# Altium PCB PCI Express Mini L1_V2.PCBDOC (part 7 of 9)
Units mm, origin at the board's own origin, x right, y up, seen from the top; angles counter-clockwise.
Board outline 70 x 83.2 mm, 6 copper layers (TopLayer, Layer 1, Layer 2, Layer 3, Layer 4, Bottom Layer), stack 0.893 mm thick; 442 components, 259 nets, 1412 pads, 870 vias.
Unrouted connection lines stored in the file: 2.
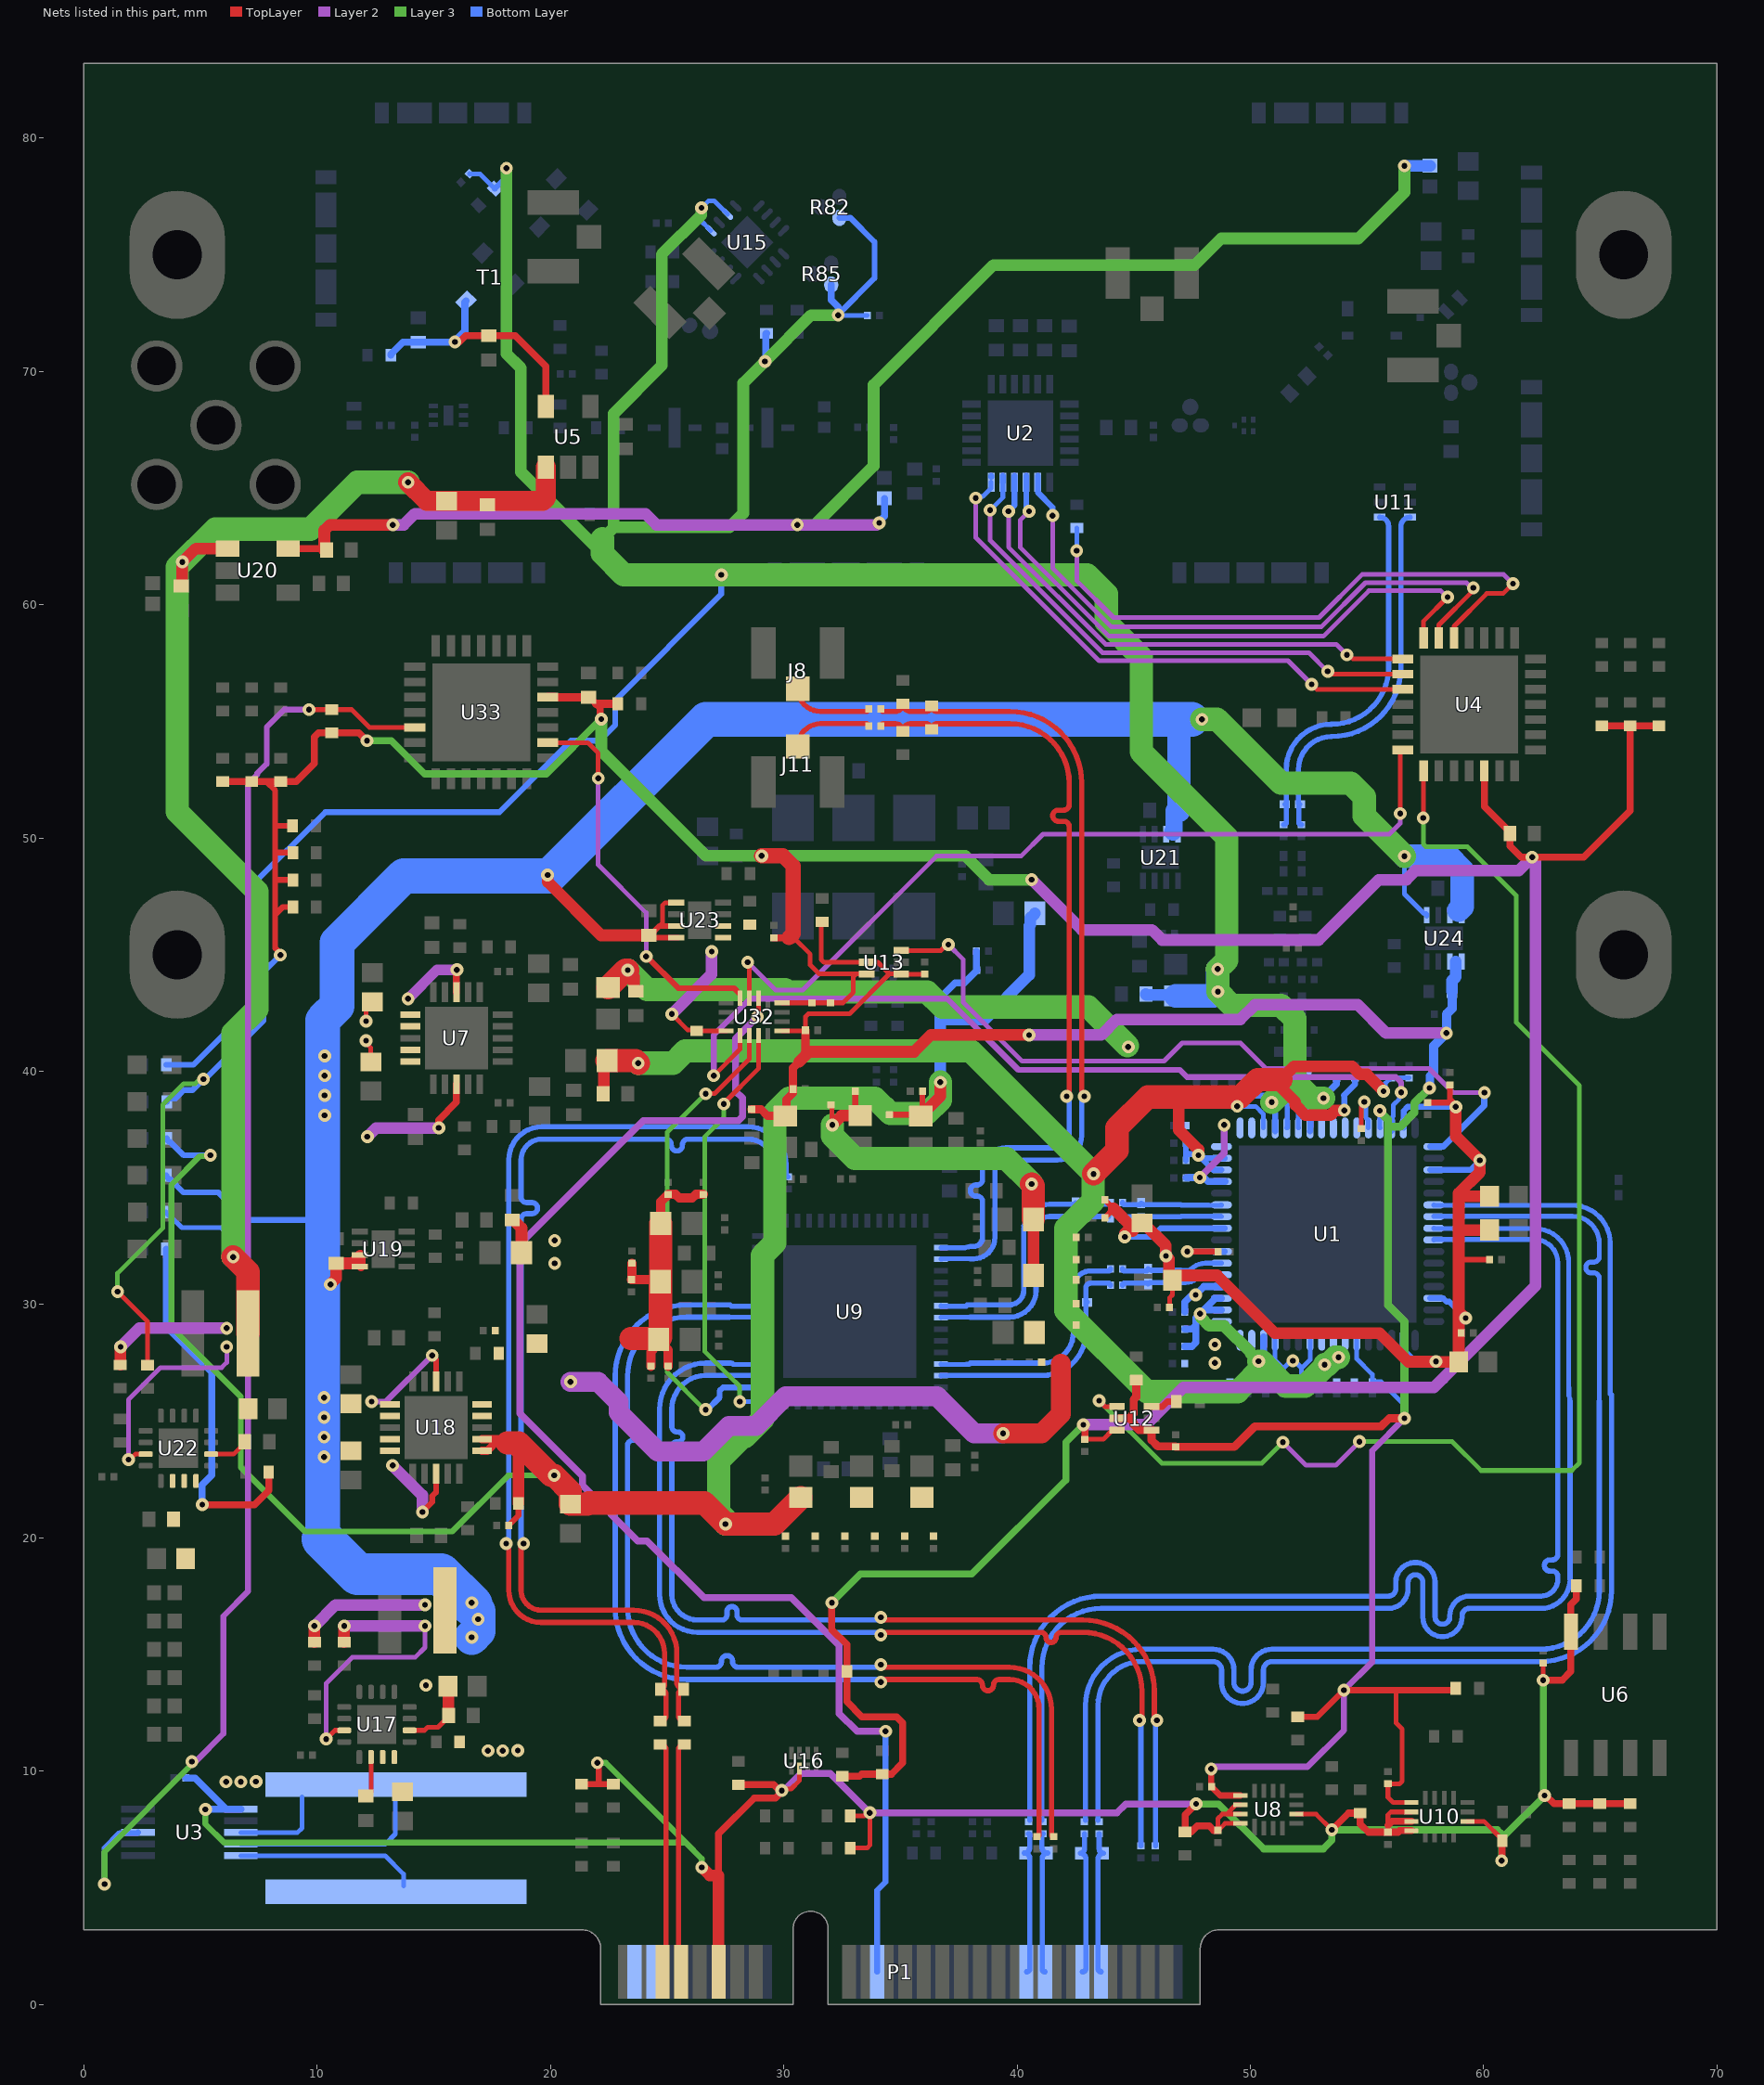
[diagram p7: the nets of this part, all layers, seen from the top]

## Via types
v1: diameter 0.55, hole 0.25, TopLayer to Bottom Layer, tented both sides, 777 vias
v2: diameter 0.5, hole 0.2, TopLayer to Bottom Layer, 43 vias
v3: diameter 0.55, hole 0.25, TopLayer to Bottom Layer, 40 vias
v4: diameter 0.35, hole 0.2, TopLayer to Bottom Layer, 10 vias

## Nets (pads, with @x,y where several pads share a name; then routed paths per layer and width w, separated by ;. In a path a pad name is that pad's centre, name@x,y a point inside that pad or via, vN(x,y) a via of type N, cw(c..) or ccw(c..) an arc to the next point about the centre after c; other vN are vias at no path point) (continued)
CLKout1_N: (continued)
  Bottom Layer w0.21: 27.839,27.441 27.845,27.435 28.931,27.435 U9.17@28.931,27.45
  Bottom Layer w0.223: 27.839,27.441 ccw(c27.715,27.318) 27.715,27.492 26.649,27.492 ccw(c26.649,25.516) 24.672,25.516 24.672,17.586 ccw(c26.303,17.586) 26.303,15.954 34.046,15.954 cw(c34.046,15.843) v1(34.157,15.843) ; v1(45.243,12.182) cw(c45.243,12.119) 45.306,12.119 C189.1@45.306,6.803
CLKout1_P: C188.1 U9.16 | length 43.7
  TopLayer w0.223: v1(34.157,16.593) ccw(c34.268,16.593) 34.268,16.482 42.814,16.482 cw(c42.814,13.414) 45.882,13.414 45.882,12.293 ccw(c45.993,12.293) v1(45.993,12.182)
  Bottom Layer w0.21: 27.659,26.965 28.931,26.965 U9.16@28.931,26.95
  Bottom Layer w0.223: 27.659,26.965 26.649,26.965 ccw(c26.649,25.516) 25.2,25.516 25.2,25.119 25.2,24.766 ccw(c25.423,24.766) 25.423,24.542 25.456,24.542 cw(c25.456,24.329) 25.67,24.329 cw(c25.456,24.329) 25.456,24.116 25.423,24.116 ccw(c25.423,23.893) 25.2,23.893 25.2,23.354 25.2,17.586 ccw(c26.303,17.586) 26.303,16.482 26.8,16.482 27.34,16.482 ccw(c27.34,16.706) 27.564,16.706 27.564,16.844 cw(c27.777,16.844) 27.777,17.057 cw(c27.777,16.844) 27.99,16.844 27.99,16.706 ccw(c28.213,16.706) 28.213,16.482 28.752,16.482 34.046,16.482 ccw(c34.046,16.593) v1(34.157,16.593) ; C188.1@45.93,6.803 45.93,12.119 cw(c45.993,12.119) v1(45.993,12.182)
CLKout3_N: C228.1 U9.22 | length 44.7
  TopLayer w0.223: v1(34.157,13.819) cw(c34.268,13.819) 34.268,13.93 37.683,13.93 38.272,13.93 cw(c38.272,13.691) 38.511,13.691 ccw(c38.75,13.691) 38.75,13.453 ccw(c38.75,13.691) 38.988,13.691 cw(c39.227,13.691) 39.227,13.93 39.663,13.93 39.676,13.93 cw(c39.676,12.663) 40.943,12.663 40.943,7.285 cw(c40.85,7.285) C228.1@40.85,7.193
  Bottom Layer w0.21: 27.696,29.991 27.752,29.935 28.706,29.935 28.916,29.935 U9.22@28.931,29.95
  Bottom Layer w0.223: 22.772,26.528 22.772,16.998 ccw(c25.84,16.998) 25.84,13.93 34.046,13.93 cw(c34.046,13.819) v1(34.157,13.819) ; 22.772,26.57 22.772,26.925 cw(c25.84,26.925) 25.84,29.992 27.693,29.992 cw(c27.693,29.988) 27.696,29.991
CLKout3_P: C227.1 U9.21 | length 44.7
  TopLayer w0.223: v1(34.157,14.569) ccw(c34.268,14.569) 34.268,14.458 39.676,14.458 cw(c39.676,12.663) 41.471,12.663 41.471,7.285 ccw(c41.564,7.285) C227.1@41.564,7.193
  Bottom Layer w0.21: 27.659,29.465 28.916,29.465 U9.21@28.931,29.45
  Bottom Layer w0.223: 27.659,29.465 25.84,29.465 ccw(c25.84,26.925) 23.3,26.925 23.3,25.402 23.3,24.906 ccw(c23.539,24.906) 23.539,24.667 23.67,24.667 cw(c23.67,24.429) 23.909,24.429 cw(c23.67,24.429) 23.67,24.19 23.539,24.19 ccw(c23.539,23.951) 23.3,23.951 23.3,23.362 23.3,16.998 ccw(c25.84,16.998) 25.84,14.458 26.649,14.458 27.088,14.458 ccw(c27.088,14.697) 27.326,14.697 27.326,14.719 cw(c27.565,14.719) 27.565,14.958 cw(c27.565,14.719) 27.804,14.719 27.804,14.697 ccw(c28.042,14.697) 28.042,14.458 28.631,14.458 34.046,14.458 ccw(c34.046,14.569) v1(34.157,14.569)
CLKout6_N: C224.1 R92.2 R97.2 U9.44 | length 36.6
  TopLayer w0.223: C224.1@34.156,54.79 cw(c34.266,54.79) 34.266,54.9 34.783,54.9 cw(c34.783,54.575) R97.2@35.108,54.575 cw(c35.433,54.575) 35.433,54.899 36.094,54.899 cw(c36.094,54.663) R92.2@36.33,54.663 cw(c36.566,54.663) 36.566,54.899 39.696,54.899 cw(c39.696,52.359) 42.236,52.359 42.236,52.024 42.236,51.435 cw(c41.997,51.435) 41.997,51.197 41.764,51.197 ccw(c41.764,50.958) 41.526,50.958 ccw(c41.764,50.958) 41.764,50.72 41.997,50.72 cw(c41.997,50.481) 42.236,50.481 42.236,49.875 42.236,39.04 cw(c42.125,39.04) v1(42.125,38.929)
  Bottom Layer w0.21: U9.44@36.731,32.45 ccw(c36.768,32.486) 36.768,32.435 37.771,32.435 cw(c37.996,31.965) 37.99,32.486 37.996,32.492
  Bottom Layer w0.223: 37.996,32.492 38.131,32.492 ccw(c38.131,32.882) 38.521,32.882 38.521,34.301 38.521,34.412 ccw(c38.282,34.412) 38.282,34.651 38.235,34.651 cw(c38.235,34.89) 37.996,34.89 cw(c38.235,34.89) 38.235,35.128 38.282,35.128 ccw(c38.282,35.367) 38.521,35.367 38.521,35.72 cw(c39.523,35.72) 39.523,36.723 41.726,36.723 ccw(c41.726,37.233) 42.236,37.233 42.236,38.818 ccw(c42.125,38.818) v1(42.125,38.929)
CLKout6_P: C223.1 R41.2 R92.1 U9.45 | length 36.6
  TopLayer w0.223: C223.1@34.156,55.54 ccw(c34.269,55.54) 34.269,55.428 34.782,55.428 ccw(c34.782,55.753) R41.2@35.107,55.753 ccw(c35.432,55.753) 35.432,55.427 36.094,55.427 ccw(c36.094,55.663) R92.1@36.33,55.663 ccw(c36.566,55.663) 36.566,55.427 39.696,55.427 cw(c39.696,52.359) 42.764,52.359 42.764,39.04 ccw(c42.875,39.04) v1(42.875,38.929)
  Bottom Layer w0.21: U9.45@36.731,31.95 cw(c36.768,31.913) 36.768,31.965 37.996,31.965
  Bottom Layer w0.223: 37.996,31.965 38.131,31.965 ccw(c38.131,32.882) 39.049,32.882 39.049,35.72 cw(c39.523,35.72) 39.523,36.195 41.726,36.195 ccw(c41.726,37.233) 42.764,37.233 42.764,38.818 cw(c42.875,38.818) v1(42.875,38.929)
CLKout6O_N: C224.2 J11.2 | length 3.7
  TopLayer w0.223: J11.2@30.598,53.923 cw(c31.576,53.923) 31.576,54.901 33.525,54.901 cw(c33.525,54.79) C224.2@33.636,54.79
CLKout6O_P: C223.2 J8.2 | length 3.7
  TopLayer w0.223: J8.2@30.598,56.401 ccw(c31.57,56.401) 31.57,55.429 33.525,55.429 ccw(c33.525,55.54) C223.2@33.636,55.54
CLKout8_N: C183.1 R135.2 U9.50 | length 10.8
  Bottom Layer w0.21: U9.50@36.731,29.45 36.731,29.465 37.996,29.465
  Bottom Layer w0.223: 37.996,29.465 39.663,29.465 ccw(c39.663,30.611) 40.81,30.611 40.81,33.2 cw(c41.387,33.2) 41.387,33.777 42.453,33.777 cw(c42.453,33.717) R135.2@42.512,33.717 cw(c42.572,33.717) 42.572,33.777 C183.1@43.914,33.777
CLKout8_P: C185.1 R135.1 U9.49 | length 10.9
  Bottom Layer w0.21: U9.49@36.731,29.95 36.731,29.935 37.831,29.935 cw(c37.889,29.935) 37.889,29.992 37.996,29.992
  Bottom Layer w0.223: 37.996,29.992 39.663,29.992 ccw(c39.663,30.611) 40.282,30.611 40.282,33.2 cw(c41.387,33.2) 41.387,34.305 42.45,34.305 ccw(c42.45,34.367) R135.1@42.512,34.367 ccw(c42.575,34.367) 42.575,34.305 C185.1@43.914,34.305
CLKout10_N: C187.1 R136.1 U9.54 | length 10.5
  Bottom Layer w0.21: U9.54@36.731,27.45 36.731,27.435 37.824,27.435 37.831,27.441 37.945,27.441 37.996,27.492
  Bottom Layer w0.223: 37.996,27.492 41.087,27.492 ccw(c41.087,28.82) 42.415,28.82 42.415,30.042 ccw(c42.353,30.042) R136.1@42.353,30.104 ccw(c42.353,30.167) 42.417,30.167 42.417,30.712 cw(c43.151,30.712) 43.151,31.446 43.91,31.446 ccw(c43.91,31.534) C187.1@43.998,31.534
CLKout10_P: C186.1 R136.2 U9.55 | length 10.5
  Bottom Layer w0.21: U9.55@36.731,26.95 36.731,26.965 37.996,26.965
  Bottom Layer w0.223: 37.996,26.965 41.087,26.965 ccw(c41.087,28.82) 42.942,28.82 42.942,30.042 cw(c43.003,30.042) R136.2@43.003,30.104 cw(c43.003,30.162) 42.945,30.162 42.945,30.712 cw(c43.151,30.712) 43.151,30.918 43.91,30.918 cw(c43.91,30.83) C186.1@43.998,30.83
CMLout1_ADC_N: C15.1 U1.22 | length 55.7
  Bottom Layer w0.21: U1.22@57.858,34.275 57.858,34.26 63.788,34.26 cw(c63.788,32.625) 65.423,32.625 65.423,26.176 cw(c65.423,26.118) 65.481,26.118 65.481,25.857
  Bottom Layer w0.223: C15.1@43.464,7.893 43.464,12.82 cw(c45.344,12.82) 45.344,14.7 46.766,14.7 48.401,14.7 cw(c48.401,14.334) 48.766,14.334 48.766,13.799 ccw(c49.66,13.799) 50.553,13.799 50.553,14.334 cw(c50.919,14.334) 50.919,14.7 53.927,14.7 62.433,14.7 ccw(c62.433,17.748) 65.481,17.748 65.481,25.857
CMLout1_ADC_P: C16.1 U1.23 | length 55.7
  Bottom Layer w0.21: U1.23@57.858,33.775 57.858,33.79 63.788,33.79 cw(c63.788,32.625) 64.953,32.625 64.953,32.056 cw(c64.721,32.056) 64.721,31.824 64.605,31.824 ccw(c64.605,31.592) 64.373,31.592 ccw(c64.605,31.592) 64.605,31.36 64.721,31.36 cw(c64.721,31.128) 64.953,31.128 64.953,30.712 64.953,25.857
  Bottom Layer w0.223: C16.1@42.936,7.893 42.936,12.82 cw(c45.344,12.82) 45.344,15.228 46.766,15.228 48.401,15.228 cw(c48.401,14.334) 49.294,14.334 49.294,13.799 ccw(c49.66,13.799) 50.025,13.799 50.025,14.334 cw(c50.919,14.334) 50.919,15.228 53.927,15.228 62.433,15.228 ccw(c62.433,17.748) 64.953,17.748 64.953,25.857
CMLout1_N: C15.2 P1.44 R98.2 | length 6.2
  Bottom Layer w0.223: C15.2@43.516,7.321 43.516,6.678 ccw(c43.709,6.678) R98.2@43.709,6.485 ccw(c43.709,6.249) 43.473,6.249 43.473,1.527 ccw(c43.6,1.527) P1.44@43.6,1.4
CMLout1_P: C16.2 P1.42 R98.1 | length 6.2
  Bottom Layer w0.223: P1.42@42.8,1.4 ccw(c42.8,1.545) 42.945,1.545 42.945,6.249 ccw(c42.709,6.249) R98.1@42.709,6.485 ccw(c42.709,6.66) 42.884,6.66 C16.2@42.884,7.321
CMLout2_ADC_N: C17.1 U1.24 | length 55.4
  Bottom Layer w0.21: U1.24@57.858,33.275 57.858,33.26 62.185,33.26 cw(c62.185,31.8) 63.645,31.8 63.645,26.825 63.652,26.145 ccw(c63.875,26.147) 63.656,26.102 63.685,25.964 cw(c63.175,25.857) 63.69,25.938 63.703,25.857
  Bottom Layer w0.223: C17.1@41.064,7.893 41.064,14.438 cw(c43.604,14.438) 43.604,16.978 50.909,16.978 55.915,16.978 ccw(c55.915,17.821) 56.758,17.821 56.758,18.104 cw(c57.073,18.104) 57.387,18.104 57.387,16.615 ccw(c58.23,16.615) 59.073,16.615 59.073,16.663 cw(c59.388,16.663) 59.388,16.978 61.818,16.978 62.451,16.978 ccw(c62.451,18.23) 63.703,18.23 63.703,25.57 63.703,25.857
CMLout2_ADC_P: C18.1 U1.25 | length 55.4
  Bottom Layer w0.21: U1.25@57.858,32.775 57.858,32.79 62.185,32.79 cw(c62.185,31.8) 63.175,31.8 63.175,25.857
  Bottom Layer w0.223: C18.1@40.536,7.893 40.536,14.438 cw(c43.604,14.438) 43.604,17.506 50.909,17.506 55.915,17.506 ccw(c55.915,17.821) 56.23,17.821 56.23,18.104 cw(c57.073,18.104) 57.915,18.104 57.915,16.615 ccw(c58.23,16.615) 58.545,16.615 58.545,16.663 cw(c59.388,16.663) 59.388,17.506 61.818,17.506 62.451,17.506 ccw(c62.451,18.23) 63.175,18.23 63.175,18.342 ccw(c62.936,18.342) 62.936,18.581 62.837,18.581 cw(c62.837,18.819) 62.599,18.819 cw(c62.837,18.819) 62.837,19.058 62.936,19.058 ccw(c62.936,19.296) 63.175,19.296 63.175,19.928 63.175,25.857
CMLout2_N: C17.2 P1.38 R104.2 | length 6.3
  Bottom Layer w0.223: C17.2@41.116,7.321 ccw(c41.116,7.269) 41.064,7.269 41.064,6.739 ccw(c41.31,6.739) R104.2@41.31,6.493 ccw(c41.31,6.257) 41.074,6.257 41.074,1.526 ccw(c41.2,1.526) P1.38@41.2,1.4
CMLout2_P: C18.2 P1.36 R104.1 | length 6.3
  Bottom Layer w0.223: P1.36@40.4,1.4 ccw(c40.4,1.546) 40.546,1.546 40.546,6.257 ccw(c40.31,6.257) 40.31,6.493 ccw(c40.31,6.719) 40.536,6.719 40.536,7.269 ccw(c40.484,7.269) C18.2@40.484,7.321